# Altium PCB Stamp_Timer_Power2.PcbDoc
Units mil, origin at the board's own origin, x right, y up, seen from the top; angles counter-clockwise.
Board outline 6000 x 4000 mil, 2 copper layers (Top Layer, Bottom Layer); 1 components, 0 nets, 28 pads, 0 vias.
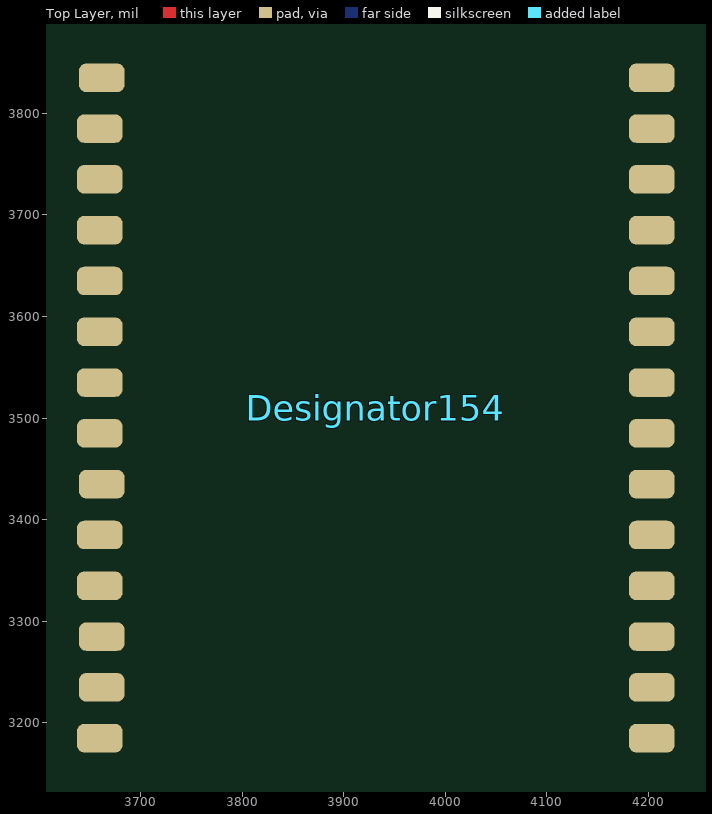
[diagram p0: Top Layer view]
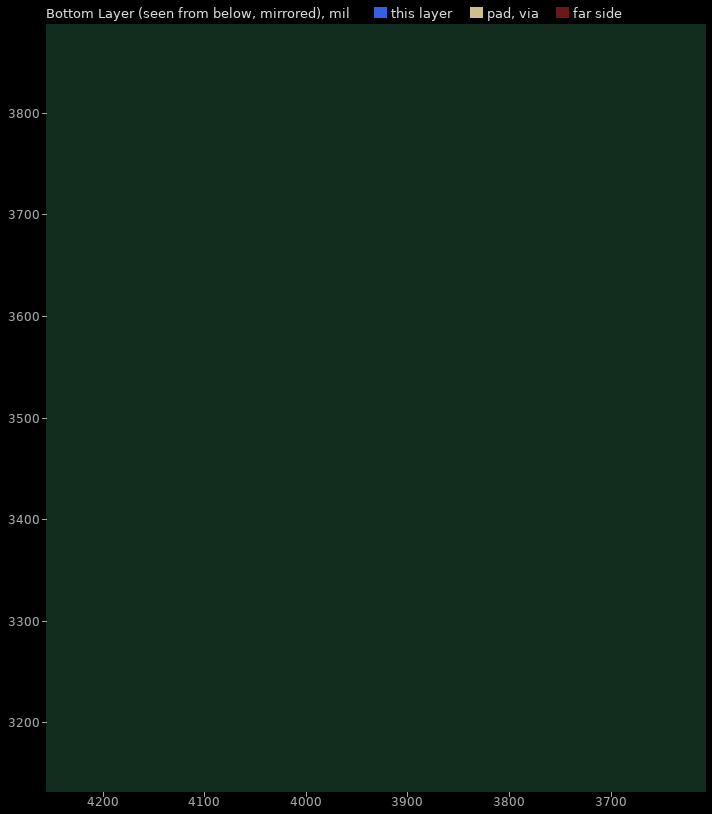
[diagram p1: Bottom Layer view, seen from below]

## Layer stack, top to bottom
Top Solder: solder mask 0.4, Solder Resist, Dk 3.5
Top Layer: signal copper 1.4
Dielectric 1: dielectric 12.6, FR-4, Dk 4.8
Bottom Layer: signal copper 1.4
Bottom Solder: solder mask 0.4, Solder Resist, Dk 3.5

## Board outline
1000,1000 7000,1000 7000,5000 1000,5000

## Design rules (kind name [scope] priority, off if disabled: settings)
Clearance [All] p1: gap=10 ignorepadtopadclearanceinfootprint=FALSE
PolygonConnect [All] p1: connectstyle=Relief reliefconductorwidth=10 reliefentries=4 polygonreliefangle="90 Angle" airgapwidth=10
RoutingVias [All] p1: holewidth=28 width=50 viastyle="Through Hole" minholewidth=28 minwidth=50 maxholewidth=28 maxwidth=50
SolderMaskExpansion [All] p1: expansion=4 istentingtop=FALSE
Width [All] p1: maxlimit=10 minlimit=10 preferedwidth=10
30 further rules are at their usual default settings.

## Components (designator, comment, footprint, x,y, rotation, side; value= is the part's Value field where it differs from the comment)
Designator154 "Comment" StampTimerPower2 3946.38,3514.65 r0 top

## Footprints (in the part's own frame and the unit in brackets; to place one, negate y for a bottom-side part, rotate by r counter-clockwise, add the part's x,y. Pads: shape width x height; smd on the part's side, far side on the other; paste and mask are expansions set on the pad)
StampTimerPower2 [mil]
  rrect50% 45x28 smd: 1(-284.41,320.35) 2(-286.38,270.35) 3(-286.38,220.35) 4(-286.38,170.35) 5(-286.38,120.35) 6(-286.38,70.35) 7(-286.38,20.35) 8(-286.38,-29.65) 9(-284.41,-79.65) 10(-286.38,-129.65) 11(-286.38,-179.65) 12(-284.41,-229.65) 13(-284.41,-279.65) 14(-286.38,-329.65) 15(256.93,320.35) 16(256.93,270.35) 17(256.93,220.35) 18(256.93,170.35) 19(256.93,120.35) 20(256.93,70.35) 21(256.93,20.35) 22(256.93,-29.65) 23(256.93,-79.65) 24(256.93,-129.65) 25(256.93,-179.65) 26(256.93,-229.65) 27(256.93,-279.65) 28(256.93,-329.65)
  body extent -286,-359 266,349, height 87

## Nets (pads, with @x,y where several pads share a name; then routed paths per layer and width w, separated by ;. In a path a pad name is that pad's centre, name@x,y a point inside that pad or via, vN(x,y) a via of type N, cw(c..) or ccw(c..) an arc to the next point about the centre after c; other vN are vias at no path point)
pads on no net: Designator154.1 Designator154.2 Designator154.3 Designator154.4 Designator154.5 Designator154.6 Designator154.7 Designator154.8 Designator154.9 Designator154.10 Designator154.11 Designator154.12 Designator154.13 Designator154.14 Designator154.15 Designator154.16 Designator154.17 Designator154.18 Designator154.19 Designator154.20 Designator154.21 Designator154.22 Designator154.23 Designator154.24 Designator154.25 Designator154.26 Designator154.27 Designator154.28